# Altium PCB Step..._Breakout.PcbDoc (part 2 of 3)
Units mil, origin at the board's own origin, x right, y up, seen from the top; angles counter-clockwise.
Board outline 1609 x 1792 mil, 2 copper layers (Top Layer, Bottom Layer), stack 57 mil thick; 115 components, 101 nets, 437 pads, 201 vias.
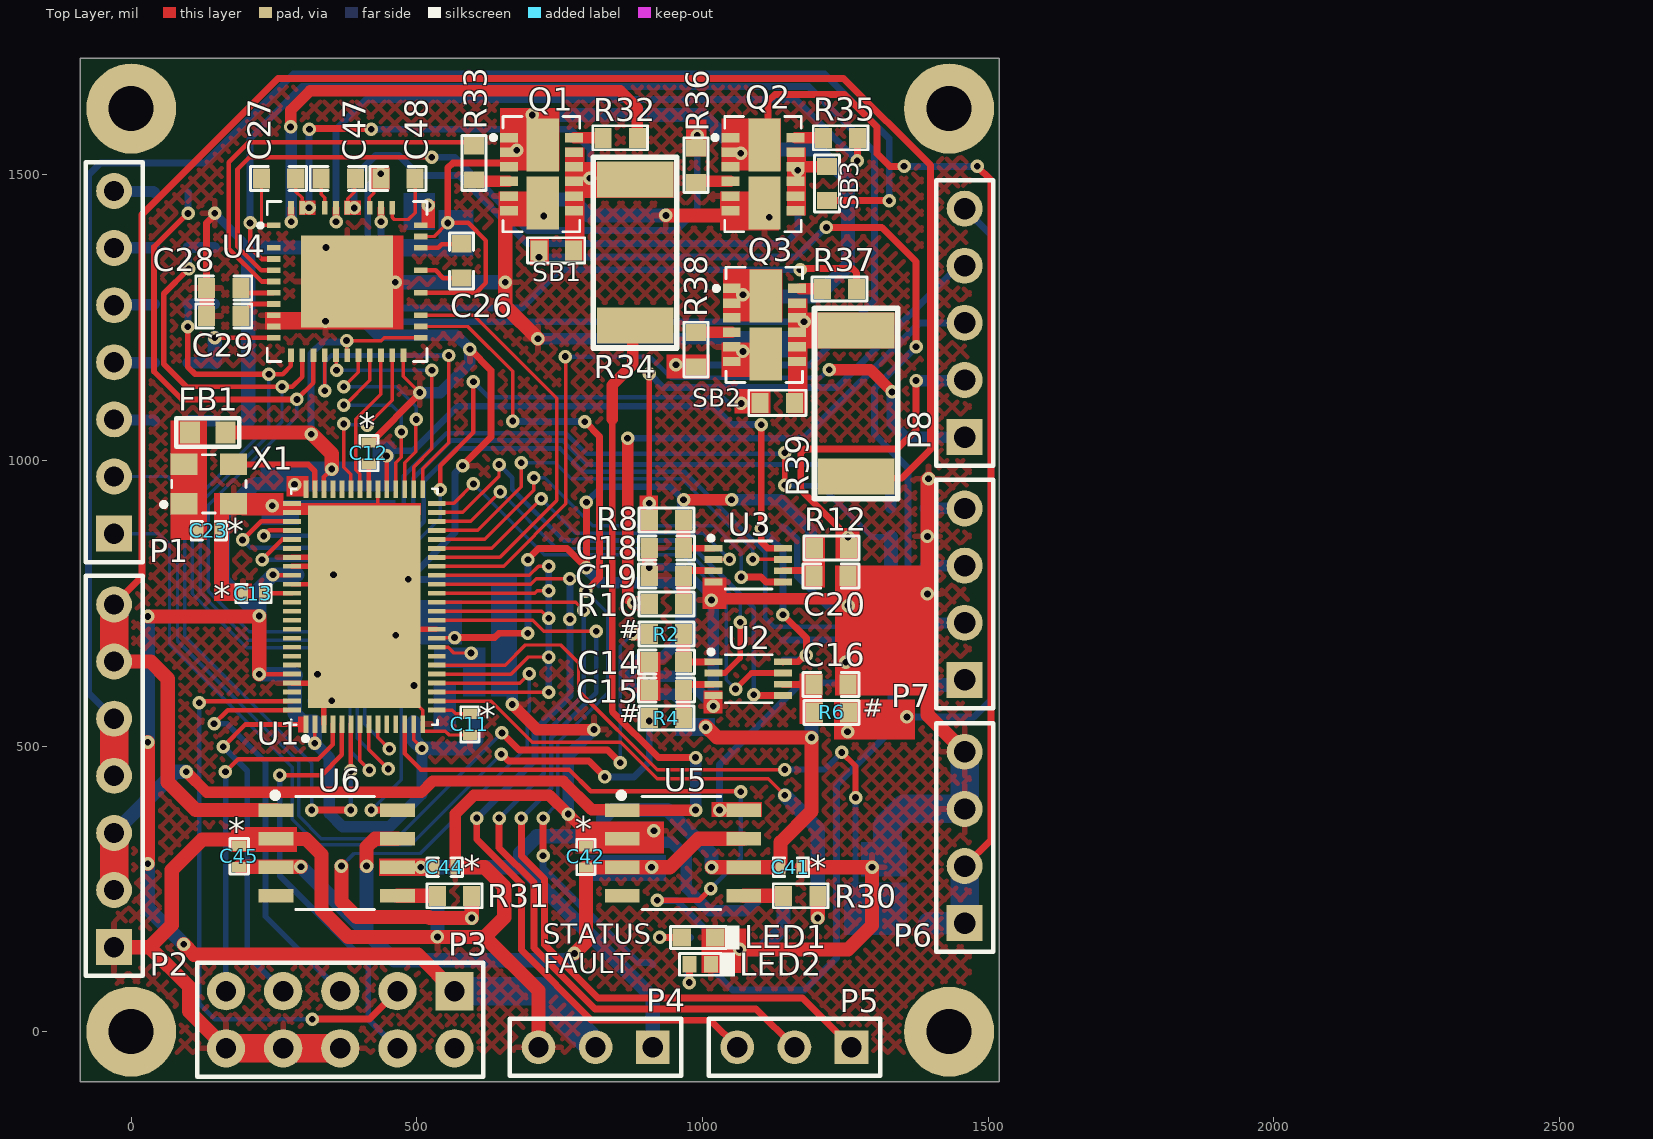
[diagram p0: Top Layer view]

## Part data (continued)
R24: library part RC0402JR-07100RL, "RES SMD 100 OHM 5% 1/16W 0402", Case Code (Imperial)=0402, Case Code (Metric)=1005, Manufacturer=Yageo, Max Operating Temperature=155°C, Max Power Dissipation=63mW, Min Operating Temperature=-55°C, Package Quantity=1, Supplier Part Number 1=311-100JRDKR-ND, Temperature Coefficient=100ppm/°C, Tolerance=5%, Voltage Rating=50V, Case/Package=0402, ComponentLink1Description=http://www.farnell.com/datasheets/1018594.pdf?src-supplier=Element14, ComponentLink1URL=http://www.farnell.com/datasheets/1018594.pdf?src-supplier=Element14, ComponentLink2Description=http://www.yageo.com/documents/recent/PYu-RC_Group_51_RoHS_L_10.pdf?src-supplier=Digi-Key, ComponentLink2URL=http://www.yageo.com/documents/recent/PYu-RC_Group_51_RoHS_L_10.pdf?src-supplier=Digi-Key, ComponentLink3Description=http://www.yageo.com/documents/recent/PYu-RC_Group_51_RoHS_L_9.pdf?src-supplier=Digi-Key, ComponentLink3URL=http://www.yageo.com/documents/recent/PYu-RC_Group_51_RoHS_L_9.pdf?src-supplier=Digi-Key, ComponentLink4Description=http://www.yageo.com/documents/recent/PYu-RC0402_51_RoHS_L_6_r.pdf?src-supplier=Future+Electronics, ComponentLink4URL=http://www.yageo.com/documents/recent/PYu-RC0402_51_RoHS_L_6_r.pdf?src-supplier=Future+Electronics, ComponentLink5Description=http://www.mouser.com/ds/2/447/PYu-RC0402_51_RoHS_L_6_r-8721.pdf?src-supplier=Mouser, ComponentLink5URL=http://www.mouser.com/ds/2/447/PYu-RC0402_51_RoHS_L_6_r-8721.pdf?src-supplier=Mouser, Composition="Thick Film", Depth=0.5mm, Features="Moisture Resistant", Height=0.016inch, Lead Free="Lead Free", Length=1mm, Manufacturer Part Number=RC0402JR-07100RL, Military Standard=Not, Number of Terminations=2, Packaging="Tape and Reel", Power Rating=63mW, Pricing 1="1=0.1, 10=0.013, 100=0.0055, 1000=0.00245, 2500=0.00212, 5000=0.00176 (USD)", REACH SVHC="No SVHC", Resistance=100R, Stock 1=6779400, Supplier 1=Digi-Key, Termination=SMD/SMT, Weight=2.3E-05oz, Width=0.02inch
R25: library part RC0603FR-07220RL, "RES SMD 220 OHM 1% 1/10W 0603", Case Code (Imperial)=0603, Case Code (Metric)=1608, Manufacturer=Yageo, Max Operating Temperature=155°C, Max Power Dissipation=100mW, Min Operating Temperature=-55°C, Package Quantity=1, Supplier Part Number 1=311-220HRCT-ND, Temperature Coefficient=100ppm/°C, Tolerance=1%, Voltage Rating=50V, Case/Package=0603, ComponentLink1Description=http://www.yageo.com/documents/recent/PYu-RC_Group_51_RoHS_L_10.pdf?src-supplier=Digi-Key, ComponentLink1URL=http://www.yageo.com/documents/recent/PYu-RC_Group_51_RoHS_L_10.pdf?src-supplier=Digi-Key, ComponentLink2Description=http://www.farnell.com/datasheets/1868787.pdf?src-supplier=Element14, ComponentLink2URL=http://www.farnell.com/datasheets/1868787.pdf?src-supplier=Element14, Composition="Thick Film", Depth=0.8mm, Features="Moisture Resistant", Height=0.022inch, Lead Free="Lead Free", Length=1.6mm, Manufacturer Part Number=RC0603FR-07220RL, Military Standard=Not, Number of Pins=2, Number of Terminations=2, Packaging="Tape and Reel", Power Rating=100mW, Pricing 1="1=0.1, 10=0.023, 100=0.0094, 1000=0.00421, 2500=0.00366 (USD)", REACH SVHC="No SVHC", Resistance=220R, Stock 1=5843995, Supplier 1=Digi-Key, Termination=SMD/SMT, Voltage Rating (DC)=50V, Width=0.031inch
R28: library part RC0603JR-0747KL, "RES SMD 47K OHM 5% 1/10W 0603", Case Code (Imperial)=0603, Case Code (Metric)=1608, Manufacturer=Yageo, Max Operating Temperature=155°C, Min Operating Temperature=-55°C, Package Quantity=5000, Power Rating=100mW, Resistance=47kR, Temperature Coefficient=100ppm/°C, Tolerance=5%, Voltage Rating=50V, Case/Package=0603, ComponentLink1Description=http://www.farnell.com/datasheets/443971.pdf, ComponentLink1URL=http://www.farnell.com/datasheets/443971.pdf, ComponentLink2Description=http://www.mouser.com/catalog/specsheets/RC0603.pdf, ComponentLink2URL=http://www.mouser.com/catalog/specsheets/RC0603.pdf, Composition="Thick Film", Depth=0.8mm, Height=0.45mm, Lead Free="Lead Free", Length=1.6mm, Manufacturer Part Number=RC0603JR-0747KL, Military Standard=Not, Number of Pins=2, Packaging="Tape and Reel", Pricing 1="5000=0.0025, 10000=0.0022, 25000=0.0019, 1=0.0011, 6000=0.001 (USD)", REACH SVHC="No SVHC", Stock 1=599135, Supplier 1=Arrow, Supplier Part Number 1=RC0603JR-0747KL, Termination=SMD/SMT, Voltage Rating (DC)=50V, Width=0.8mm
R32 R33 R35 R36 R37 R38: library part RC0603FR-0710RL, "RES SMD 10 OHM 1% 1/10W 0603", Case Code (Imperial)=0603, Case Code (Metric)=1608, Manufacturer=Yageo, Max Operating Temperature=155°C, Min Operating Temperature=-55°C, Power Rating=100mW, Supplier Part Number 1=311-10.0HRDKR-ND, Temperature Coefficient=200ppm/°C, Tolerance=1%, Voltage Rating=50V, Case/Package=0603, ComponentLink1Description=http://www.farnell.com/datasheets/1868787.pdf?src-supplier=Element14, ComponentLink1URL=http://www.farnell.com/datasheets/1868787.pdf?src-supplier=Element14, ComponentLink2Description=http://www.yageo.com/documents/recent/PYu-RC0603_51_RoHS_L_4.pdf?src-supplier=Avnet, ComponentLink2URL=http://www.yageo.com/documents/recent/PYu-RC0603_51_RoHS_L_4.pdf?src-supplier=Avnet, ComponentLink3Description=http://documents.rs-components.com/techlib://itc_doclist_GB.htm?stockno=5048984&src-supplier=RSComponents, ComponentLink3URL=http://documents.rs-components.com/techlib://itc_doclist_GB.htm?stockno=5048984&src-supplier=RSComponents, ComponentLink4Description=http://www.yageo.com/documents/recent/PYu-RC0603_51_RoHS_L_4.pdf?src-supplier=Avnet+Europe, ComponentLink4URL=http://www.yageo.com/documents/recent/PYu-RC0603_51_RoHS_L_4.pdf?src-supplier=Avnet+Europe, Composition="Thick Film", Contact Plating=Tin,Matte, Depth=0.8mm, Height=0.45mm, Lead Free="Lead Free", Length=1.6mm, Manufacturer Part Number=RC0603FR-0710RL, Military Standard=Not, Number of Pins=2, Packaging="Tape and Reel", Pricing 1="1=0.1, 10=0.046, 100=0.0187, 1000=0.0084, 2500=0.00729 (USD)", Radiation Hardening=No, REACH SVHC="No SVHC", Resistance=10R, Stock 1=10836596, Supplier 1=Digi-Key, Termination=SMD/SMT, Voltage Rating (DC)=50V, Width=0.8mm
R34 R39: library part CRE2512-FZ-R003E-3, "RES 0.003 OHM 1% 3W 2512", Case Code (Imperial)=2512, Case Code (Metric)=6432, Manufacturer=Bourns, Max Operating Temperature=170°C, Max Power Dissipation=3W, Min Operating Temperature=-55°C, Resistance=3mR, Resistor Type="Metal Film,Metal Alloy,Thick Film", Temperature Coefficient=75ppm/°C, Tolerance=1%, Case/Package=2512, Category="Chip SMD Resistors", ComponentLink1Description=https://datasheet.ciiva.com/46424/1838634-46424792.pdf?src-supplier=Element14, ComponentLink1URL=https://datasheet.ciiva.com/46424/1838634-46424792.pdf?src-supplier=Element14, ComponentLink2Description=https://datasheet.ciiva.com/46424/1838634-46424793.pdf?src-supplier=Element14, ComponentLink2URL=https://datasheet.ciiva.com/46424/1838634-46424793.pdf?src-supplier=Element14, ComponentLink3Description=https://datasheet.ciiva.com/48532/cre-48532221.pdf?src-supplier=Avnet, ComponentLink3URL=https://datasheet.ciiva.com/48532/cre-48532221.pdf?src-supplier=Avnet, Contact Plating=Tin, Depth=3.35mm, Features="Moisture Resistant,Automotive AEC-Q200", Height=0.035inch, Length=0.254inch, Manufacturer Part Number=CRE2512-FZ-R003E-3, Mount="Surface Mount", Number of Terminations=2, Packaging="Cut Tape", Power Rating=3W, Pricing 1="1=0.51890, 10=0.41630, 25=0.38400, 100=0.30630, 250=0.29870, 500=0.29120, 1000=0.28360, 3000=0.27600, 6000=0.26850 (USD)", REACH SVHC="No SVHC", RoHS=No, Stock 1=7276, Supplier 1="Arrow Electronics", Supplier Part Number 1=CRE2512-FZ-R003E-3, Termination=Solder, Width=0.132inch
RT1: library part NCP18XH103F03RB, "THERMISTOR NTC 10KOHM 3380K 0603", Case Code (Imperial)=0603, Case Code (Metric)=1608, Current Rating=310uA, Manufacturer=Murata, Manufacturer Series=NCP18, Max Operating Temperature=125°C, Max Power Dissipation=100mW, Min Operating Temperature=-40°C, Package Quantity=1, Package Shape=Rectangular, Resistance=10kR, Resistance Tolerance=1%, Accuracy=0.7%, Case/Package=0603, Category=Thermistors, ComponentLink1Description=https://datasheet.ciiva.com/11822/0900766b807f1e39-11822112.pdf?src-supplier=RSComponents, ComponentLink1URL=https://datasheet.ciiva.com/11822/0900766b807f1e39-11822112.pdf?src-supplier=RSComponents, ComponentLink2Description=https://datasheet.ciiva.com/4504/r44e-3685-4504704.pdf?src-supplier=Mouser, ComponentLink2URL=https://datasheet.ciiva.com/4504/r44e-3685-4504704.pdf?src-supplier=Mouser, ComponentLink3Description=https://datasheet.ciiva.com/2848/r44e-2848446.pdf?src-supplier=Digi-Key, ComponentLink3URL=https://datasheet.ciiva.com/2848/r44e-2848446.pdf?src-supplier=Digi-Key, ComponentLink4Description=https://datasheet.ciiva.com/2848/r44e-2848445.pdf?src-supplier=Digi-Key, ComponentLink4URL=https://datasheet.ciiva.com/2848/r44e-2848445.pdf?src-supplier=Digi-Key, ComponentLink5Description=https://datasheet.ciiva.com/2848/r44e-2848447.pdf?src-supplier=Digi-Key, ComponentLink5URL=https://datasheet.ciiva.com/2848/r44e-2848447.pdf?src-supplier=Digi-Key, ComponentLink6Description=https://datasheet.ciiva.com/3280/l0770e-3280679.pdf?src-supplier=Avnet, ComponentLink6URL=https://datasheet.ciiva.com/3280/l0770e-3280679.pdf?src-supplier=Avnet, ComponentLink7Description=https://datasheet.ciiva.com/16469/l0770e-16469741.pdf?src-supplier=Future+Electronics, ComponentLink7URL=https://datasheet.ciiva.com/16469/l0770e-16469741.pdf?src-supplier=Future+Electronics, ComponentLink8Description=https://datasheet.ciiva.com/17993/getdatasheetpartid-153236-17993210.pdf?src-supplier=Verical, ComponentLink8URL=https://datasheet.ciiva.com/17993/getdatasheetpartid-153236-17993210.pdf?src-supplier=Verical, Depth=0.8mm, Height=0.8mm, Lead Free="Lead Free", Length=1.6mm, Manufacturer Part Number=NCP18XH103F03RB, Mount="Surface Mount", Number of Pins=2, Number of Terminals/Pins=2, Packaging="Tape and Reel", Power Rating=100mW, Pricing 1="4000=0.08160 (USD)", Radiation Hardening=No, REACH SVHC="No SVHC", RoHS=Yes, RoHS Compliant=Yes, Series=NCP, Stock 1=60000, Supplier 1="Arrow Electronics", Supplier Part Number 1=NCP18XH103F03RB, Terminal Finish=Tin, Terminal Placement=Dual, Termination=SMD/SMT, Thermistor Application="TEMPERATURE COMPENSATION", Tolerance=1%
SB1 SB2 SB3: "Solder Bridge ON"
U1: "SERVO CONTROLLER IC, QFN76", Manufacturer=Trinamic, Supplier Part Number 1=700-TMC4671-LA, Category="Motor Drivers", Manufacturer Part Number=TMC4671-LA, Pricing 1="1=12.54000, 10=11.53000, 25=11.05000, 50=11.05000, 100=9.26000, 261=8.66000, 522=8.05000, 1000=8.05000, 1044=7.64000, 10000=7.64000 (USD)", RoHS=No, Supplier 1=Mouser
U2 U3: "IC BUFF SCHMT TRG TRPL 8VSSOP", Case/Package=VSSOP, High Level Output Current=32mA, Manufacturer="NXP Semiconductors", Manufacturer Part Number=74LVC3G17DC125, Max Operating Temperature=125°C, Max Supply Voltage=5.5V, Min Operating Temperature=-40°C, Min Supply Voltage=1.65V, Package Quantity=3000, Quiescent Current=40uA, Supplier Part Number 1=568-9369-2-ND, Category="Clock Buffers, Drivers", ComponentLink1Description=https://datasheet.ciiva.com/1839/74lvc3g17-1839116.pdf?src-supplier=Digi-Key, ComponentLink1URL=https://datasheet.ciiva.com/1839/74lvc3g17-1839116.pdf?src-supplier=Digi-Key, ComponentLink2Description=https://datasheet.ciiva.com/1839/74lvc3g17-1839115.pdf?src-supplier=Digi-Key, ComponentLink2URL=https://datasheet.ciiva.com/1839/74lvc3g17-1839115.pdf?src-supplier=Digi-Key, ComponentLink3Description=https://datasheet.ciiva.com/1839/74lvc3g17-1839117.pdf?src-supplier=Digi-Key, ComponentLink3URL=https://datasheet.ciiva.com/1839/74lvc3g17-1839117.pdf?src-supplier=Digi-Key, ComponentLink4Description=https://datasheet.ciiva.com/8260/74lvc3g17-8260965.pdf?src-supplier=Avnet, ComponentLink4URL=https://datasheet.ciiva.com/8260/74lvc3g17-8260965.pdf?src-supplier=Avnet, Contact Plating=Gold, Lead Free="Lead Free", Logic Function="Schmitt Trigger,Buffer", Low Level Output Current=32mA, Mount="Surface Mount", Number of Bits per Element=1, Number of Channels=3, Number of Elements=3, Number of Input Lines=3, Number of Inputs=3, Number of Output Lines=3, Number of Outputs=3, Number of Pins=8, Packaging="Tape and Reel", Polarity=Non-Inverting, Propagation Delay=13.1ns, Radiation Hardening=No, RoHS=Yes, Series=74LVC, Supplier 1=Digi-Key, Technology=CMOS, Turn-On Delay Time=13.1ns
U4: "GATE DRIVER IC 8-60V QFN37", Manufacturer=Trinamic, Supplier Part Number 1=700-TMC6100LA, Manufacturer Part Number=TMC6100-LA, Pricing 1="1=4.30000, 10=3.65000, 50=3.65000, 100=3.00000, 250=2.69000, 416=2.59000, 832=2.15000, 1000=2.15000, 2912=2.07000, 5408=2.00000, 10000=2.07000, 10400=1.95000 (USD)", RoHS=No, Stock 1=19, Supplier 1=Mouser
U5 U6: "IC CURRENT SENSE 1 CIRCUIT 8SOIC", Case/Package=SOIC, Input Capacitance=2pF, Input Offset Voltage (Vos)=200uV, Manufacturer="Analog Devices", Max Dual Supply Voltage=2.75V, Max Operating Temperature=125°C, Max Supply Voltage=5.5V, Min Dual Supply Voltage=1.35V, Min Operating Temperature=-40°C, Min Supply Voltage=2.7V, Operating Supply Current=2.6mA, Power Supply Rejection Ratio (PSRR)=80dB, Supplier Part Number 1=584-AD8418WBRZ-RL, -3db Bandwidth=250kHz, Category="Power Management ICs", Common Mode Rejection Ratio=90dB, ComponentLink1Description=https://datasheet.ciiva.com/30008/ad8418-30008109.pdf?src-supplier=Avnet, ComponentLink1URL=https://datasheet.ciiva.com/30008/ad8418-30008109.pdf?src-supplier=Avnet, Contact Plating=Tin,Matte, Lead Free="Contains Lead", Manufacturer Part Number=AD8418WBRZ-RL, Mount="Surface Mount", Number of Circuits=1, Number of Pins=8, Packaging="Tape and Reel", Pricing 1="1=3.18000, 10=2.86000, 25=2.70000, 50=2.70000, 100=2.34000, 250=2.22000, 500=1.99000, 1000=1.70000, 2500=1.69000, 10000=1.69000 (USD)", RoHS=Yes, Slew Rate=1V/µs, Supplier 1=Mouser
X1: library part SX3M25.000M20F30TNN, "1.62V~3.63V -40℃~+85℃ 10mA ±20ppm CMOS 25MHz SMD3225-4P Oscillators ROHS", Manufacturer="SCTF Elec", ComponentLink1Description=LCSC, ComponentLink1URL=https://lcsc.com/product-detail/Oscillators_Shenzhen-SCTF-Elec-SX3M25-000M20F30TNN_C2901575.html, Manufacturer Part Number=SX3M25.000M20F30TNN

## Free pads (board coordinates)
  round 157.48 hole 78.74 unplated: MH1(0,1616) MH2(1432,1616) MH3(1432,0) MH4(0,0)

## Via types
v1: diameter 23.62, hole 11.81, Top Layer to Bottom Layer, tented both sides, 201 vias

## Nets (pads, with @x,y where several pads share a name; then routed paths per layer and width w, separated by ;. In a path a pad name is that pad's centre, name@x,y a point inside that pad or via, vN(x,y) a via of type N, cw(c..) or ccw(c..) an arc to the next point about the centre after c; other vN are vias at no path point)
1A$: C18.2 R8.2 U3.1 | length 100.5
  Top Layer w12: C18.2@967.47,846.53 U3.1@1018.98,846.53
  Top Layer w25: C18.2@967,847 R8.2@967,896
1A%: C14.2 R2.2 U2.1 | length 100.4
  Top Layer w12: C14.2@967.53,647.53 U2.1@1018.98,647.53
  Top Layer w25: C14.2@967,647 R2.2@967,696
2.5V: U1.17 U1.19 U1.26 U1.28 U1.30 | length 1228.6
  Top Layer w6: U1.17@534.57,594.39 v1(731,594.39) ; U1.19@534.57,625.89 664.89,625.89 695,656 v1(731,656) ; U1.26@534.57,736.13 718.67,736.13 730.8,724 v1(731,724) ; U1.28@534.57,767.62 706.62,767.62 711,772 v1(731,772) ; U1.30@534.57,799.12 697.12,799.12 713,815 v1(731,815)
  Bottom Layer w12: v1(731,594.39) v1(731,656) v1(731,724) v1(731,772) v1(731,815)
2A$: C19.2 R10.2 U3.3 | length 104.9
  Top Layer w12: C19.2@967,798 967,798.16 976,807.16 U3.3@1018.98,807.16
  Top Layer w25: R10.2@967,749 C19.2@967,798
2A%: C15.2 R4.2 U2.3 | length 105.9
  Top Layer w12: C15.2@967,598 967,599.16 976,608.16 U2.3@1018.98,608.16
  Top Layer w25: R4.2@967,549 C15.2@967,598
2V5: C39.1 C42.1 C45.1 R26.2 R27.2 U5.3 U5.7 U6.3 U6.7 | length 1320.4
  Top Layer w25: C45.1@189.81,288.69 v1(297,288.69) ; v1(412,290) 412,323.36 426.64,338 U6.7@466.3,338 ; v1(776,137) 796,157 C42.1@796,287.5 ; C42.1@796.5,288 U5.3@859.7,288 v1(911,288) 943,288 993,338 U5.7@1072.3,338
  Bottom Layer w25: v1(297,288.69) 409.34,176.34 460.69,125 764,125 v1(776,137) ; 411,178 412,179 v1(412,290)
3A$: C20.2 R12.2 U3.6 | length 57.9
  Top Layer w12: U3.6@1141.02,807.16 1186,807.16 1195,798.16 C20.2@1195,798
3A%: C16.2 R6.2 U2.6 | length 49
  Top Layer w12: U2.6@1141.02,608.16 1141.12,608.06 1156.94,608.06 1157,608 C16.2@1190,608
3V3: C1.1 C2.1 C3.1 C4.1 C5.1 C6.1 C7.1 C8.1 C17.1 C21.1 C25.1 FB1.1 P3.1 P4.2 RT1.1 U1.2 U1.13 U1.43 U1.50 U1.52 U1.61 U1.72 U2.8 U3.8 U4.16 U4.22 | length 5121
  Top Layer w6: v1(321.28,505.26) U1.2@321.28,538.57 ; U4.16@378.06,1184.49 377.53,1185.02 377.53,1209.47 v1(377,1210) 438,1210 443,1215 U4.22@507,1215 ; U1.43@447,949.69 U1.43@447.37,949.32 ; U1.13@494.5,542.39 494.5,510.94 509,496.44 v1(509,496)
  Top Layer w8: v1(224,625.89) U1.72@281.43,625.89 ; v1(248,800) 248.55,799.45 281.09,799.45 U1.61@281.43,799.12 ; U1.50@337.13,949.32 337.13,971.13 v1(351,985) ; U1.43@447,949.69 v1(447,1008)
  Top Layer w12: v1@1103,1061.81 v1(1103,881) 1103,857 1113.47,846.53 U3.8@1141.02,846.53 ; U2.8@1141.02,647.53 1141.12,647.62 1167.48,647.62 1178.86,659 v1(1182,659) 1182,689 v1(1141,730)
  Top Layer w25: v1(29,294) v1(29,507) ; v1(29,727) 223.09,727 v1(224,727.91) v1(224,625.89) ; v1(92,153) 110,135 502,135 P3.1@566,71 ; FB1.1@164.91,1049 v1@314,1049 ; v1@316,1047 351,1012 v1(351,985)
  Bottom Layer w12: v1(315,1046) 315,1187 335.5,1207.5 C25.1@379,1207.5 377,1209.5 v1(377,1210) ; v1(447,1008) 447,1009 455,1017 493.4,1017 571.4,1095 1019,1095 1051.19,1062.81 v1(1103,1062.81) ; v1(1103,881) 1103,880.5 1136.5,847 C21.1@1140,847 1141,846 v1(1141,730) ; C17.1@1140,649 1141.64,650.64 1170.5,650.64 1178.86,659 v1(1182,659)
  Bottom Layer w20: v1(321.28,505.26) 347,479.54 347,382 370,359 452,359 509,416 v1(509,496)
  Bottom Layer w25: v1(29,294) 29,216 v1(92,153) ; v1(29,507) v1(29,727) ; v1(224,625.89) 286.11,625.89 C8.1@288,624 286.25,622.25 286.25,556.89 300.64,542.5 C2.1@321,542.5 C2.1@321.28,542.5 ; v1(248,800) 224,776 v1(224,727.91) 160,791.91 160,903 215.5,958.5 238.5,958.5 248,968 C7.1@248,969 ; v1@251,800 C6.1@290.5,800 ; v1(321.28,505.26) C2.1@321.28,542.5 ; C2.1@321.28,543.26 C2.1@321.28,542.5 ; C5.1@494.5,542 494.5,510.5 v1(509,496) 589.36,496 604,510.64 604,545 RT1.1@605,546
  Bottom Layer w50: P3.1@566,71 715,71 P4.2@813,-27
  other v1: 286,958
5V: C9.1 C10.1 C41.1 C44.1 P4.1 R1.2 R3.2 R5.2 R7.2 R9.2 R11.2 R26.1 U1.23 U5.6 U6.6 | length 3163.8
  Top Layer w6: U1.23@534.57,688.88 535.13,689.44 565.44,689.44 v1(566,690)
  Top Layer w12: v1(566,690) 636.38,690 643.88,697.5 694.02,697.5 v1(694.34,697.82) ; v1@693.5,826.5 713,846 763,846 v1(797,812) v1(797,927)
  Top Layer w20: v1(967,931.31) v1(1051,931.31)
  Top Layer w25: v1@1006,535 1026,515 v1(1191,515) 1191,386 1136.5,331.5 C41.1@1136.5,288 U5.6@1072.3,288 v1(1016,288)
  Bottom Layer w12: v1@694.5,698 v1@694.5,826 ; v1(797,927) 824,954 944.31,954 v1(967,931.31)
  Bottom Layer w20: v1@803,804 821,786 950.28,786 962,774.28 962,755 R9.2@967,750 ; v1@965,930.31 965.5,929.81 R7.2@965.5,912.5 ; R3.2@967,549 962.36,553.64 962.36,579.28 950.64,591 890,591 874,607 874,637 892,655 930,655 967,692 967,694.5 R1.2@967,697 ; v1@1051.34,931 1137,931 1190.54,877.46 1190.54,851.46 R11.2@1195,847
  Bottom Layer w25: v1(507,288) 685,288 ; P4.1@913,-27 913,60 685,288 ; R1.2@967,694.5 969.5,692 R1.2@972,692 ; v1(1016,288) 1016,311 939,388 840.82,388 826.18,373.36 826.18,344.5 823.68,342 710,342 680.86,312.86 680.86,292.14 685,288 ; R5.2@1190,558 1191,557 v1(1191,515)
  other v1: 1006,533 694.5,826.5
+VM: C24.1 C30.1 C31.2 C49.1 C50.1 C51.1 P6.1 P6.2 Q1.1 Q1.2 Q1.3 Q1.13 Q2.1 Q2.2 Q2.3 Q2.13 Q3.1 Q3.2 Q3.3 Q3.13 R28.1 U4.25 U4.28 | length 3584.3
  Top Layer w6: U4.28@507,1392.17 530.17,1392.17 v1(554,1416)
  Top Layer w8: U4.25@507,1293.74 603.74,1293.74 621,1311 621,1385 590,1416 v1(554,1416)
  Top Layer w12: v1(554,1416) 554,1512 563,1521 657,1521 657,1516.45 659.27,1514.18 Q1.3@661,1514.18 ; Q2.13@1116.69,1552.09 1115,1553.79 1115,1629 1127,1641 1249,1641 1305.89,1584.11 1305.89,1537.11 1328,1515 v1(1353,1515) ; P6.2@1459,290 1505,336 1505,1491 v1(1481,1515)
  Top Layer w25: Q1.13@697.62,1553.38 696,1553.38 718.91,1573.9 720.69,1586.59 Q1.13@720.69,1552.09
  Bottom Layer w12: v1(1353,1515) v1(1481,1515) v1@1477.86,1515
  Bottom Layer w25: v1(675,1543) C49.1@725,1543 ; v1(702,1605) 1000,1605 v1(1067,1538) C50.1@1117,1538 1123.31,1544.31 1201.69,1544.31 1255,1491 1255,1341 1201,1287 C51.1@1124,1287 1121,1290 v1(1071,1290)
  Bottom Layer w40: R28.1@1397,190 P6.1@1459,190
  Bottom Layer w50: P6.1@1459,190 P6.2@1459,290
\C\S\_\C\T\R\L\: C32.1 R15.1 U1.6 | length 1040.5
  Top Layer w8: v1(384.38,456.62) U1.6@384.38,538.68
  Top Layer w12: v1(316,388) v1(384.38,388)
  Bottom Layer w6: R15.1@100,1070 94,1064 94,692 316,470 v1(316,388)
  Bottom Layer w8: v1(384.38,388) v1(384.38,456.62)
  Bottom Layer w20: R15.1@100,1070 C32.1@145,1070
\C\S\_\D\B\G\_\S\P\I\: P3.3 U1.75 | length 1070
  Top Layer w8: v1@118,576 120.32,578.32 281.09,578.32 U1.75@281.43,578.65
  Top Layer w12: v1(317,22) 417,22 P3.3@466,71
  Bottom Layer w8: v1(119,576) 119,49 146,22 v1(317,22)
\C\S\_\D\R\V\: C33.1 R16.1 U4.10 | length 191.1
  Top Layer w8: v1(146,1215) U4.10@249.13,1215
  Bottom Layer w20: R16.1@100,1171 C33.1@145,1171
  Bottom Layer w25: C33.1@146,1172 v1(146,1215)
ADC_VM: C40.1 R28.2 R29.2 U1.20 | length 1116.6
  Top Layer w6: U1.20@534.57,641.64 654.64,641.64 690,677 752,677 783,646 783,596.56 920.56,459 v1(1144,459)
  Top Layer w10: v1(1244,489) 1268,465 v1(1268,410)
  Bottom Layer w6: 1261,241 1268,248
  Bottom Layer w10: v1(1144,459) 1214,459 v1(1244,489) ; 1268,248 v1(1268,410)
AENC_UX_POS: P5.1 U1.25 | length 1518.8
  Top Layer w6: U1.25@534.57,720.38 702.62,720.38 722,701 v1(814,701)
  Top Layer w12: v1(683,374) 683,307.74 723.61,267.13 723.61,152.39 817,59 1175,59 P5.1@1261,-27
  Bottom Layer w8: v1(683,374) 735,426 735,514.62 814,593.62 v1(814,701)
AENC_VN_POS: P5.2 U1.27 | length 1468.8
  Top Layer w6: U1.27@534.57,751.87 778.13,751.87 v1(792,738)
  Top Layer w12: v1(644,374) 644,322 705,261 705,146.96 811.96,40 1094,40 P5.2@1161,-27
  Bottom Layer w8: v1(644,374) 722,452 722,520 792,590 v1(792,738)
AENC_WY_POS: P5.3 U1.29 | length 1435.7
  Top Layer w6: U1.29@534.57,783.37 699.37,783.37 709,793 v1(768,793)
  Top Layer w12: v1(605,374) 605,336.96 683,258.96 683,143 806,20 1014,20 P5.3@1061,-27
  Bottom Layer w12: v1(605,374) 707,476 707,527 768,588 v1(768,722) v1(768,793)
AGPI_B: C22.1 R13.2 R14.2 U1.22 | length 64.6
  Top Layer w6: U1.22@534.57,673.13 U1.22@534.57,673.13 554.93,673.07 565,663 v1(595,663)
BMU_: C27.2 Q1.7 Q1.8 Q1.9 Q1.10 Q1.11 R34.2 SB1.1 U4.36 | length 762.7
  Top Layer w6: C27.2@288,1494 288,1470.87 299.21,1459.66 299.21,1442.48 U4.36@299.32,1442.36 v1(311.36,1442.36)
  Top Layer w12: v1@312,1578 v1@313.5,1579.5 ; v1@313.5,1581.5 v1@418.5,1581.5 ; v1@418.5,1579.5 v1@420,1581 ; v1@802,1494 v1(803,1494)
  Bottom Layer w12: v1(311.36,1442.36) v1@311.36,1578 ; v1(420,1580) 768,1580 803,1545 v1(803,1494)
  other v1: 312,1580
BMV_: C47.2 Q2.7 Q2.8 Q2.9 Q2.10 Q2.11 SB3.1 U4.33 | length 1137.1
  Top Layer w6: U4.33@378.06,1442.36 379.42,1443.72 379.42,1458.54 390.22,1469.34 390.22,1491.72 C47.2@392.5,1494
  Top Layer w20: Q2.10@1163.17,1514.18 1163.58,1514.59 1167,1511.17 v1(1167,1508) ; Q2.9@1164.69,1488.59 v1@1164.69,1497.59 ; 1181.69,1514.59 1210.5,1514.59 1210.91,1515 SB3.1@1218,1515
  Bottom Layer w12: v1(390.22,1442.25) 390.22,1496.44 427.78,1534 469,1534 504,1499 574,1499 693,1380 1145,1380 1167,1402 v1(1167,1508)
BMW_: C48.2 Q3.7 Q3.8 Q3.9 Q3.10 Q3.11 R39.2 SB2.1 U4.32 | length 1134.8
  Top Layer w6: U4.32@417.43,1442.36 417,1442.8 417,1460 424.64,1467.64 424.64,1489.64 v1(437,1502)
  Top Layer w25: Q3.8@1165.48,1198.91 Q3.9@1165.48,1224.5 Q3.10@1165.48,1250.09
  Bottom Layer w12: v1(437,1502) 414,1479 414,1272 443,1243 v1(1178,1243)